# Altium PCB SOM_PCB_6Layer.PcbDoc (part 5 of 6)
Units mil, origin at the board's own origin, x right, y up, seen from the top; angles counter-clockwise.
Board outline 1230 x 2725 mil, 6 copper layers (Top Layer, GND+SHIELD, MidLayer1, MidLayer2, PWR, Bottom Layer), stack 60.8 mil thick; 76 components, 194 nets, 972 pads, 577 vias.
Unrouted connection lines stored in the file: 151.
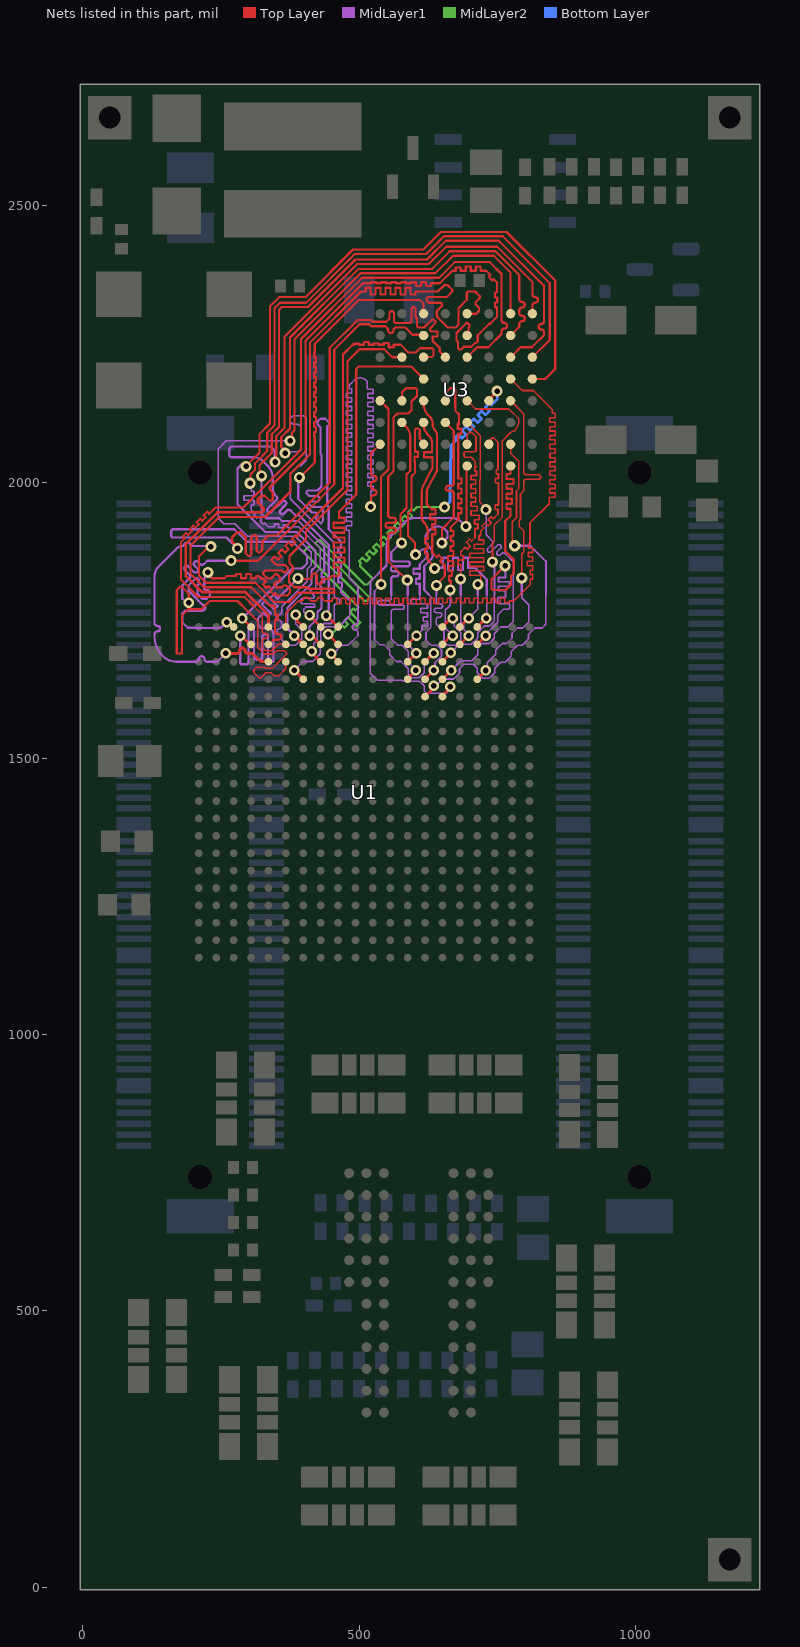
[diagram p8: the nets of this part, all layers, seen from the top]

## Via types
v1: diameter 19, hole 10, Top Layer to Bottom Layer, tented both sides, 352 vias
v2: diameter 20, hole 10, Top Layer to Bottom Layer, tented both sides, 223 vias
v3: diameter 20, hole 10, Top Layer to Bottom Layer, 1 vias
v4: diameter 30, hole 15, Top Layer to Bottom Layer, tented both sides, 1 vias

## Nets (pads, with @x,y where several pads share a name; then routed paths per layer and width w, separated by ;. In a path a pad name is that pad's centre, name@x,y a point inside that pad or via, vN(x,y) a via of type N, cw(c..) or ccw(c..) an arc to the next point about the centre after c; other vN are vias at no path point) (continued)
FLASH_A7: U1.C5 U3.C2 | length 1514.1
  Top Layer w4: v2(231.67,1883.5) 227.83,1883.5 210.55,1866.22 210.55,1830.27 222.82,1818 312,1818 346.66,1783.34 373.34,1783.34 390,1800 455,1800 455,1804 452,1807 408.09,1807 405.26,1809.83 382.54,1809.83 373.17,1819.21 373.17,1832.46 379.89,1839.19 379.89,1847.48 374,1853.37 374,1866.63 402.37,1895 402.66,1895 403.94,1896.28 403.94,1911.06 479,1986.12 479,2219 500.76,2240.76 545.82,2240.76 560.32,2226.26 U3.C2@577.52,2226.26
  Top Layer w5: v1(258.5,1690) 278.5,1690 ccw(c278.5,1695) 283.5,1695 cw(c288.5,1695) 293.5,1695 ccw(c298.5,1695) 298.5,1690 307.17,1690 321.52,1675.64 335.34,1675.64 U1.C5@336.02,1674.96
  MidLayer1 w4: v2(231.67,1883.5) 230.87,1884.3 199.3,1884.3 cw(c199.3,1889.3) 194.35,1888.58 192.01,1890.92 186.59,1890.92 184.25,1888.58 cw(c179.3,1889.3) 179.3,1884.3 ccw(c179.3,1872.23) 170.77,1880.77 137.07,1847.07 ccw(c154.14,1830) 130,1830 130,1742.93 131.46,1741.46 ccw(c135,1745) 135,1740 cw(c135,1735) 135,1730 ccw(c135,1725) 130,1725 130,1721.21 ccw(c181.21,1721.21) 130.01,1719.99 ccw(c181.21,1721.21) 145,1685 ccw(c169.14,1709.14) 151.75,1679.76 ccw(c169.14,1709.14) 169.14,1675 205,1675 ccw(c205,1680) 210,1680 cw(c215,1680) 220,1680 ccw(c225,1680) 225,1675 243.5,1675 v1(258.5,1690)
FLASH_A8: U1.D7 U3.A3 | length 1550
  Top Layer w4: v2(392.19,2008.69) 393.52,2010.03 394.17,2010.03 420,2035.86 420,2080 420,2082 419,2082 419,2091 422,2091 422,2100 419,2100 419,2109 422,2109 422,2118 419,2118 419,2127 422,2127 422,2136 419,2136 419,2145 422,2145 422,2154 419,2154 419,2163 422,2163 422,2172 419,2172 419,2181 422,2181 422,2190 419,2190 419,2199 422,2199 422,2208 419,2208 419,2217 422,2217 422,2226 419,2226 419,2235 420,2235 420,2238.81 420,2250.25 499.75,2330 610,2330 616.89,2323.11 U3.A3@616.89,2305
  Top Layer w5: v1(382.86,1659.62) U1.D7@399.02,1643.46
  MidLayer1 w3: v1(382.86,1659.62) 398.67,1675.44 416.01,1675.44 430,1689.44 430,1709.55 430.54,1710.09 430.54,1730.2 438.74,1738.4 463.2,1738.4 483,1758.2 483,1785.49 472.24,1796.24
  MidLayer1 w4: v2(392.19,2008.69) 390,2006.5 390,1970 415,1945 421.63,1945 424.34,1942.28 424.34,1939.34 422.26,1937.26 422.26,1933.95 430.61,1925.61 435,1930 435,1952.66 432.66,1955 415,1955 410,1960 410,1962.66 412.34,1965 425,1965 428.34,1968.34 428.34,1971.66 425,1975 410,1975 405,1980 405,1982.66 407.34,1985 425,1985 432.18,1992.18 432.18,2049.6 430,2051.78 430,2100 425,2105 425,2110 430,2115 438.75,2115 445.84,2107.9 445.84,2104.59 442.5,2101.25 442.5,1957.64 445,1955.14 445,1915 467.5,1892.5 467.5,1881.5 462.5,1881.5 462.5,1872.5 467.5,1872.5 467.5,1863.5 462.5,1863.5 462.5,1854.5 467.5,1854.5 467.5,1845.5 462.5,1845.5 462.5,1836.5 467.5,1836.5 467.5,1827.5 462.5,1827.5 462.5,1818.5 469.08,1818.5 469.08,1809.5 467.5,1809.5 467.5,1800.99 472.24,1796.24
FLASH_A9: U1.C6 U3.B3 | length 1568.4
  Top Layer w3: 299.39,1765.61 316.53,1748.47 316.53,1701.2 328.78,1688.96 344.64,1688.96 350.68,1695 365,1695 368.76,1691.24 368.76,1688.76 343.46,1663.46 331.26,1663.46 329.72,1665 315,1665 310,1660 310,1655 319.41,1645.59 321.89,1645.59 331.26,1654.96 340.79,1654.96 345.75,1650 355,1650 367.52,1662.52 U1.C6@367.52,1674.96
  Top Layer w4: v1(191.68,1781.9) 191.68,1782.07 191.9,1782.29 191.9,1798.1 180,1810 175,1810 170,1805 170,1690 179.79,1690 179.79,1759.08 190.71,1770 215,1770 230,1785 280,1785 299.39,1765.61 ; v2(268.51,1858) 316.94,1858 455,1996.06 455,2240 500.76,2285.76 518.48,2285.76 522.03,2282.21 547.49,2282.21 552.5,2277.2 552.5,2275.13 ccw(c557.5,2275.13) 562.5,2275.13 cw(c567.5,2275.13) 567.5,2280.13 583.53,2280.13 596.7,2266.96 615.56,2266.96 U3.B3@616.89,2265.63
  MidLayer1 w4: v1(191.68,1781.9) 188.23,1781.9 180.94,1789.18 180,1789.18 180,1812.98 193.31,1826.29 ccw(c190.13,1829.47) 193.31,1832.66 184.75,1841.22 cw(c187.93,1844.4) 184.75,1847.58 cw(c187.93,1844.4) 191.12,1847.58 201,1837.69 ccw(c204.18,1840.88) 207.37,1837.69 ccw(c204.18,1840.88) 207.37,1844.06 202.21,1849.21 cw(c205.39,1852.4) 202.21,1855.58 cw(c205.39,1852.4) 208.57,1855.58 212.4,1851.75 ccw(c215.59,1854.93) 218.77,1851.75 225.02,1858 v2(268.51,1858)
FLASH_A10: U1.A3 U3.C3 | length 1502.7
  Top Layer w4: v2(226.55,1836.9) 226.55,1832.78 233.33,1826 256.63,1826 260.63,1830 270,1830 277.25,1830 277.25,1834 286.25,1834 286.25,1826 295.25,1826 295.25,1834 304.25,1834 304.25,1826 313.25,1826 313.25,1830 315.25,1830 319,1830 321.63,1827.37 321.63,1826 323.04,1824.59 325.07,1826.61 331.44,1820.25 326.25,1815.06 332.61,1808.7 336.3,1812.39 342.66,1806.02 339.24,1802.6 345.61,1796.24 348.5,1799.13 350.99,1796.64 351.39,1796.24 352.63,1795 370,1795 375,1800 375,1806.06 368.11,1812.95 362.95,1812.95 360,1810 350,1810 346.66,1813.34 346.66,1816.66 350,1820 354.66,1820 357,1822.34 357,1828 351.66,1833.34 348.34,1833.34 340.66,1825.66 334.34,1825.66 326.66,1833.34 326.66,1836.66 330,1840 360,1840 363.04,1836.96 366.35,1836.96 370.87,1841.48 370.87,1845.19 366.06,1850 356.78,1850 cw(c356.78,1865.98) 345.48,1854.68 340.86,1859.3 347.23,1865.66 353.22,1859.67 359.58,1866.04 353.59,1872.02 359.96,1878.39 365.94,1872.4 372.31,1878.77 366.32,1884.75 372.68,1891.12 378.67,1885.13 385.04,1891.49 379.05,1897.48 385.41,1903.84 387.86,1901.39 392.17,1905.7 392.17,1910.6 471,1989.43 471,2231 488.76,2248.76 490.76,2248.76 490.76,2250.76 499.76,2250.76 499.76,2248.76 508.76,2248.76 508.76,2253.76 517.76,2253.76 517.76,2248.76 526.76,2248.76 526.76,2251.13 535.76,2251.13 535.76,2248.76 544.76,2248.76 544.76,2251.73 553.76,2251.73 553.76,2244.14 562.76,2244.14 562.76,2248.76 570.74,2248.76 575.53,2248.76 589.33,2234.96 602.58,2234.96 610.11,2242.48 632.66,2242.48 635,2240.14 635,2230 631.39,2226.39 617.02,2226.39 U3.C3@616.89,2226.26
  Top Layer w5: v1(260.32,1746.74) 261.81,1746.74 270.6,1737.95 U1.A3@273.03,1737.95
  MidLayer1 w4: v2(226.55,1836.9) 226.55,1833.1 220,1826.56 220,1806.69 222.34,1804.34 227.66,1804.34 230,1802 230,1800 230.05,1799.95 230.05,1794.95 224.26,1789.16 215.84,1789.16 207.43,1797.57 207.43,1813.79 210,1816.36 210,1823.67 207.66,1826.01 204.34,1826.01 191.12,1812.79 191.12,1803.78 192.24,1802.66 216.75,1778.15 cw(c216.75,1773.15) 216.75,1768.15 215.99,1767.4 184.94,1767.4 179.92,1762.37 179.92,1746.79 190,1736.7 206.6,1736.7 207.34,1735.96 249.18,1735.96 259.96,1746.74 v1(260.32,1746.74)
FLASH_A11: U1.B4 U3.D3 | length 1467.7
  Top Layer w4: v2(389.17,1825.83) 390,1825 410,1825 ccw(c410,1829.5) 414.5,1829.5 414.5,1830.5 cw(c419,1830.5) 423.5,1830.5 423.5,1819.5 ccw(c428,1819.5) 432.5,1819.5 432.5,1820.5 cw(c437,1820.5) 437,1825 445,1825 448.09,1828.09 450,1830 461.34,1830 463.69,1832.34 463.69,1843.69 463.69,1845.69 453.69,1845.69 453.69,1854.69 473.69,1854.69 473.69,1863.69 453.69,1863.69 453.69,1872.69 473.69,1872.69 473.69,1881.69 453.69,1881.69 453.69,1890.69 473.69,1890.69 473.69,1899.69 453.69,1899.69 453.69,1908.69 473.69,1908.69 473.69,1917.69 453.69,1917.69 453.69,1926.69 473.69,1926.69 473.69,1935.69 463.69,1935.69 463.69,1946.31 495,1977.63 495,2205 499.39,2209.39 594.39,2209.39 U3.D3@616.89,2186.89
  Top Layer w5: v1(284.86,1722.2) 284.86,1724.04 302.45,1706.46 U1.B4@304.53,1706.46
  MidLayer1 w4: v1(284.86,1722.2) 284.86,1673 ccw(c287.2,1673) 287.2,1670.66 297.66,1670.66 ccw(c297.66,1673) 300,1673 300,1737 cw(c302.34,1737) 302.34,1739.34 310,1739.34 310,1684.08 ccw(c315.36,1684.08) 315.36,1678.72 320.72,1678.72 ccw(c320.72,1683) 325,1683 325,1720 cw(c329.34,1720) 329.34,1724.34 332.66,1724.34 cw(c332.66,1722) 335,1722 335,1677.34 ccw(c337.34,1677.34) 337.34,1675 345,1675 345,1725.63 ccw(c335.63,1725.63) 335.63,1735 326.26,1735 cw(c326.26,1744.31) 316.95,1744.31 316.95,1753.62 319.17,1755.83 ; 320.58,1757.25 319.17,1755.83 ; v2(389.17,1825.83) 356.67,1793.33 352.4,1789.07 345.23,1796.24 338.86,1789.88 353.11,1775.63 346.74,1769.27 330.5,1785.52 324.13,1779.15 340.38,1762.9 334.02,1756.54 326.95,1763.61 319.17,1755.83
FLASH_A12: U1.A4 U3.C4 | length 1619.8
  Top Layer w4: v2(280,1880) 280,1882.63 270,1892.63 270,1900 280,1910 285,1910 295,1900 295,1871 299.34,1866.66 302.66,1866.66 305,1869 305,1900 309.13,1904.13 312.66,1904.13 315,1901.78 315,1875.37 317.34,1873.03 320.66,1873.03 325,1877.37 325,1892.66 336.02,1903.69 351.31,1903.69 447,1999.37 447,2243.31 497.45,2293.76 521.79,2293.76 525.05,2290.5 549.4,2290.5 555,2296.1 555,2307 557.34,2309.34 560.66,2309.34 563.02,2306.98 563.02,2290.47 565.36,2288.13 592.66,2288.13 595,2290.47 595,2315 596.73,2316.73 600.05,2316.73 602.39,2314.39 602.39,2298.99 605,2296.38 605,2282.47 607.34,2280.13 617.66,2280.13 631.8,2294.28 635.17,2294.28 638.17,2291.27 638.17,2287.96 628.48,2278.27 628.48,2274.96 630.82,2272.62 638.33,2272.62 641.76,2272.62 641.76,2263.62 633.33,2263.62 633.33,2254.62 cw(c633.33,2252.59) 634.77,2254.02 646.05,2242.74 646.05,2236.56 656.26,2226.35 U3.C4@656.26,2226.26
  Top Layer w5: v1(288.42,1753.34) 288.78,1753.34 304.17,1737.95 U1.A4@304.53,1737.95
  MidLayer1 w4: v2(280,1880) 260,1900 162.34,1900 160,1902.34 160,1912.66 162.34,1915 274.39,1915 296.97,1892.42 380.21,1892.42 406,1866.63 406,1853.37 396.63,1844 379.08,1844 v1(288.42,1753.34)
FLASH_A13: U1.B5 U3.A5 | length 1571.6
  Top Layer w4: U1.B5@336.02,1706.46 337.32,1706.46 345.86,1715 355,1715 359.34,1719.34 359.34,1722.66 357,1725 351.48,1725 348.02,1728.46 348.02,1740 348.02,1751 353.02,1751 353.02,1760 348.02,1760 348.02,1765 348.02,1773.99 345.68,1776.34 338.66,1776.34 331.59,1783.41 328.3,1786.7 325,1790 305,1810 219.51,1810 195,1834.51 195,1885 247,1937 329.63,1937 376,1983.37 376,2015.13 411,2050.13 411,2252.57 503.43,2345 510,2345 512,2345 512,2352 521,2352 521,2340 530,2340 530,2352 539,2352 539,2340 548,2340 548,2352 557,2352 557,2340 566,2340 566,2352 575,2352 575,2340 584,2340 584,2352 593,2352 593,2340 602,2340 602,2345 612.3,2345 642.63,2345 654.66,2357.03 660.12,2357.03 668.57,2348.57 668.57,2345 658.57,2335 624.31,2335 621.97,2332.66 621.97,2329.34 ; 622.55,2328.77 626.31,2325 647.75,2325 650.1,2322.66 650.1,2319.34 640.82,2310.07 640.82,2299.93 660.75,2280 675,2280 680,2285 680,2315 695,2330 695,2342.66 697.34,2345 710,2345 718.34,2336.66 718.34,2333.34 710.66,2325.66 710.66,2322.34 716.25,2316.75 cw(c714.44,2314.94) 717,2314.94 717,2311.88 cw(c712.46,2311.88) 715.67,2308.67 712,2305 U3.A5@695.63,2305
FLASH_A14: U1.A5 U3.B5 | length 1565.2
  Top Layer w4: 322.99,1974.91 322.99,1975.61 329.39,1975.61 338.34,1966.66 341.66,1966.66 344,1969 344,1981 337.84,1987.16 337.84,1990.47 353.37,2006 353.45,2006 403,2055.55 403,2255.88 507.12,2360 520.12,2360 522.12,2360 522.12,2362 531.12,2362 531.12,2360 540.12,2360 540.12,2362 549.12,2362 549.12,2360 558.12,2360 558.12,2362 567.12,2362 567.12,2360 576.12,2360 576.12,2362 585.12,2362 585.12,2360 594.12,2360 594.12,2362 603.12,2362 603.12,2355 612.12,2355 612.12,2362 621.12,2362 621.12,2355 630.12,2355 630.12,2360 640,2360 646.31,2360 669.12,2382.81 673.09,2382.81 675.09,2382.81 675.09,2388.77 684.09,2388.77 684.09,2382.81 693.09,2382.81 693.09,2390.34 702.09,2390.34 702.09,2382.81 711.09,2382.81 711.09,2390.34 720.09,2390.34 720.09,2382.81 730.04,2382.81 730.34,2382.52 738.12,2374.74 734.99,2371.62 741.36,2365.25 743.64,2367.53 750,2361.17 749.5,2360.67 749.5,2354.5 749.5,2343.5 746,2343.5 746,2334.5 750,2334.5 750,2325.5 746,2325.5 746,2316.5 749.5,2316.5 749.5,2311.2 749.5,2298.99 737.43,2286.92 735.78,2286.92 715,2266.14 715,2255 712.19,2252.19 710.24,2252.19 703.06,2245 690,2245 685.1,2240.1 681.79,2240.1 679.1,2242.79 679.1,2254.1 676.42,2256.79 676.42,2270.1 694,2287.69 697.31,2287.69 700,2285 700,2281.52 698.12,2279.64 698.12,2268.12 U3.B5@695.63,2265.63
  Top Layer w5: 323.3,1975.22 322.99,1974.91 317.07,1968.99 317.07,1962.93 327.43,1952.57 327.43,1948.43 324.5,1945.5 243.48,1945.5 186.5,1888.52 186.5,1830 213.54,1802.96 214.52,1802.96 215.99,1801.5 294.11,1801.5 336.02,1759.58 U1.A5@336.02,1737.95
FLASH_A15: U1.B6 U3.C5 | length 1517.9
  Top Layer w3: 310,1775 324.52,1760.48 324.52,1731.69 ccw(c329.52,1731.69) 329.52,1726.69 cw(c329.52,1721.69) 329.52,1716.69 ccw(c329.52,1711.69) 324.52,1711.69 324.52,1701.69 331.26,1694.96 342.15,1694.96 353.65,1706.46 U1.B6@367.52,1706.46
  Top Layer w4: 310,1775 293,1792 209.31,1792 205.07,1796.24 178,1823.31 178,1892.04 182.98,1897.02 184.39,1898.44 180.86,1901.97 187.22,1908.33 190.76,1904.8 197.12,1911.16 193.59,1914.7 199.95,1921.06 203.49,1917.53 209.85,1923.89 206.31,1927.43 212.68,1933.79 216.21,1930.26 222.58,1936.62 219.04,1940.15 225.41,1946.52 228.94,1942.98 235.31,1949.35 239.96,1954 290.06,1954 350.06,2014 350.14,2014 395,2058.86 395,2259.2 505.8,2370 645,2370 673.34,2398.34 736.66,2398.34 758,2377 758,2293.12 ccw(c763,2293.12) 763,2288.12 cw(c763,2283.12) 763,2278.12 ccw(c763,2273.12) 758,2273.12 758,2268.12 734.06,2244.19 713.56,2244.19 U3.C5@695.63,2226.26
FLASH_A16: U1.A6 U3.D7 | length 1555.5
  Top Layer w3: U1.A6@367.52,1737.95 367.52,1762.79 389.73,1785 394.73,1785 ccw(c394.73,1790) 399.73,1790 401.2,1791.46 408.27,1791.46 409.73,1790 ccw(c414.73,1790) 414.73,1785 419.73,1785 ccw(c419.73,1790) 424.73,1790 426.2,1791.46 433.27,1791.46 434.73,1790 ccw(c439.73,1790) 439.73,1785 450.18,1785 451.68,1785 451.68,1790 459.68,1790 459.68,1780 467.68,1780 467.68,1790 475.68,1790 475.68,1780 483.68,1780 483.68,1790 491.68,1790 491.68,1780 499.68,1780 499.68,1790 507.68,1790 507.68,1780 515.68,1780 515.68,1790 523.68,1790 523.68,1780 531.68,1780 531.68,1790 539.68,1790 539.68,1780 547.68,1780 547.68,1790 555.68,1790 555.68,1780 563.68,1780 563.68,1790 571.68,1790 571.68,1780 579.68,1780 579.68,1790 587.68,1790 587.68,1780 595.68,1780 595.68,1790 603.68,1790 603.68,1780 611.68,1780 611.68,1790 619.68,1790 619.68,1780 627.68,1780 627.68,1790 635.68,1790 635.68,1780 643.68,1780 643.68,1790 651.68,1790 651.68,1782 659.68,1782 659.68,1790 667.68,1790 667.68,1782 675.68,1782 675.68,1790 683.68,1790 683.68,1782 691.68,1782 691.68,1790 699.68,1790 699.68,1782 707.68,1782 707.68,1790 715.68,1790 715.68,1782 723.68,1782 723.68,1790 731.68,1790 731.68,1782 739.68,1782 739.68,1790 747.68,1790 747.68,1782 755.68,1782 755.68,1790 763.68,1790 763.68,1782 771.68,1782 771.68,1785 780,1785 810,1815 810,1815.38 810,1824.88 814.5,1824.88 814.5,1832.88 810,1832.88 810,1840.88 814.5,1840.88 814.5,1848.88 804.5,1848.88 804.5,1856.88 814.5,1856.88 814.5,1864.88 806.3,1864.88 806.3,1872.88 814.5,1872.88 814.5,1880.88 806.33,1880.88 806.33,1888.88 809.5,1888.88 809.5,1895.81 809.5,1926.57 844.15,1961.22 844.15,1971.73 845,1972.58 855,1972.58 855,1980.58 845,1980.58 845,1988.58 855,1988.58 855,1996.58 845,1996.58 845,2004.58 855,2004.58 855,2012.58 845,2012.58 845,2020.58 855,2020.58 855,2028.58 845,2028.58 845,2036.58 855,2036.58 855,2044.58 845.5,2044.58 845.5,2052.58 855,2052.58 855,2060.58 845,2060.58 845,2068.58 855,2068.58 855,2076.58 845,2076.58 845,2084.58 855,2084.58 855,2092.58 845,2092.58 845,2100.58 855,2100.58 855,2108.58 845,2108.58 845,2116.58 855,2116.58 855,2124.58 850,2124.58 850,2129.56 850,2131.06 815.17,2165.89 795.37,2165.89 U3.D7@774.37,2186.89
FLASH_A17: U1.B7 U3.D8 | length 1589.1
  Top Layer w4: v2(295.44,2028.62) 296.42,2029.88 296.88,2030.56 320.09,2053.77 320.09,2087.46 339,2106.37 339,2318.31 355.69,2335 402.92,2335 489.08,2421.16 616.16,2421.16 648,2453 767,2453 855,2365 855,2205 836.89,2186.89 U3.D8@813.74,2186.89
  Top Layer w5: v1(382.54,1722.2) 383.27,1722.2 U1.B7@399.02,1706.46
  MidLayer1 w4: v2(295.44,2028.62) 291.57,2031.59 290.1,2031.59 288.34,2033.34 280,2025 280,1960 330,1910 387.37,1910 421,1876.37 421,1847.16 414,1840.16 414,1816.43 393.81,1796.24 370.39,1772.83 370.39,1735.08 382.54,1722.94 v1(382.54,1722.2)
FLASH_A18: U1.A7 U3.A7 | length 1505.9
  Top Layer w4: v2(375.34,2074.78) 378.4,2077.84 378.4,2089.21 383,2093.8 383,2258.51 502.65,2378.16 638.16,2378.16 670,2410 743.69,2410 774.37,2379.32 U3.A7@774.37,2305
  Top Layer w5: v1(385.39,1760) 388.07,1757.32 388.07,1748.9 U1.A7@399.02,1737.95
  MidLayer1 w3: v2(375.34,2074.78) 259.78,2074.78 245,2060 245,1935 255,1925 275,1925 298,1902 384.77,1902 413.5,1873.27 413.5,1850.27 406,1842.77 406,1820.75 381.49,1796.24 360,1774.75 360,1765 cw(c355,1765) 355,1760 ccw(c355,1755) 355,1750 cw(c355,1745) 360,1745 360,1740 cw(c355,1740) 355,1735 ccw(c355,1732) 352,1732 352,1728 ccw(c355,1728) 355,1725 cw(c355,1720) 360,1720 360,1715 370,1705 385.13,1705 396.54,1716.41 396.54,1732.26 385.39,1743.41 v1(385.39,1760)
FLASH_A19: U1.C8 U3.B7 | length 1519.6
  Top Layer w4: v2(366.13,2052.62) 366.13,2056.95 359.34,2063.73 359.34,2081.46 375,2097.12 375,2261.82 499.33,2386.16 632.47,2386.16 664.31,2418 747,2418 790,2375 790,2331.26 ccw(c795,2331.26) 795,2326.26 cw(c795,2321.26) 795,2316.26 ccw(c795,2311.26) 790,2311.26 790,2306.26 ccw(c795,2306.26) 795,2301.26 cw(c795,2296.26) 795,2291.26 ccw(c795,2286.26) 790,2286.26 790,2281.26 U3.B7@774.37,2265.63
  Top Layer w5: v1(414.76,1694) 414.76,1690.71 U1.C8@430.51,1674.96
  MidLayer1 w3: v2(366.13,2052.62) 368.51,2055 390,2055 395,2060 395,2100 390,2105 380,2105 375,2110 375,2115 380,2120 400,2120 404.18,2115.82 404.18,2039.18 395,2030 390,2030 375.5,2015.5 375.5,1970.11 455,1890.61 455,1795 ccw(c460,1795) 460,1790 cw(c460,1785) 460,1780 ccw(c460,1775) 455,1775 455,1750 449.4,1744.4 436.25,1744.4 424.54,1732.69 424.54,1714.1 417.83,1707.39 417.83,1697.06 v1(414.76,1694)
FLASH_A20: U1.B8 U3.C7 | length 1478.5
  Top Layer w4: v2(323.66,2011.6) 323.58,2011.6 320.07,2015.11 320.07,2031.13 342,2053.06 342,2086.75 355,2099.75 355,2311.69 360.31,2317 407.55,2317 493.55,2403 623,2403 657,2437 753,2437 835,2355 835,2291.38 cw(c830,2291.38) 830,2286.38 ccw(c830,2281.38) 830,2276.38 cw(c830,2271.38) 835,2271.38 835,2266.38 812.8,2244.19 792.3,2244.19 U3.C7@774.37,2226.26
  Top Layer w5: v1(410.54,1722.2) 414.76,1722.2 U1.B8@430.51,1706.46
  MidLayer1 w4: v2(323.66,2011.6) 323.66,1942.66 331.6,1934.71 355.29,1934.71 360,1930 390,1930 437,1883 437,1840.53 432,1835.53 432,1828 437,1828 437,1819 430,1819 430,1810 432,1810 432,1808 432,1798.45 432,1772.1 425,1765.1 425,1753.79 410.54,1739.32 v1(410.54,1722.2)
FLASH_A21: U1.A8 U3.C8 | length 1589.3
  Top Layer w4: v2(302.9,1998.16) 303.6,1998.86 303.6,2014.16 311.91,2022.46 311.91,2034.28 334,2056.37 334,2090.06 347,2103.06 347,2315 357,2325 404.24,2325 492.39,2413.16 621.84,2413.16 653.69,2445 760,2445 845,2360 845,2257.52 U3.C8@813.74,2226.26
  Top Layer w5: v1(410.35,1759.65) 410.35,1758.88 430.51,1738.72 U1.A8@430.51,1737.95
  MidLayer1 w3: v2(302.9,1998.16) 305,1996.06 305,1985 305,1983.5 310,1983.5 310,1975.5 291.64,1975.5 291.64,1967.5 310,1967.5 310,1959.5 305,1959.5 305,1953.56 305,1950 306.06,1948.94 311.97,1943.03 309.77,1940.83 315.43,1935.18 317.98,1937.73 323.64,1932.07 321.09,1929.52 326.74,1923.86 328.94,1926.06 330,1925 335.3,1919.7 340.15,1919.7 346.98,1919.7 346.98,1924.42 354.98,1924.42 354.98,1917.5 362.98,1917.5 362.98,1922.5 370.98,1922.5 370.98,1917.5 378.98,1917.5 378.98,1919.7 380.48,1919.7 389.7,1919.7 429.5,1879.89 429.5,1843.64 421.5,1835.64 421.5,1806.5 421.34,1806.34 414.51,1806.34 411.96,1803.79 411.96,1801.3 419.01,1794.24 419.01,1791.76 417.26,1790 396.76,1790 395,1788.24 395,1781.76 396.76,1780 418.24,1780 420,1778.24 420,1774.12 404.12,1774.12 400,1770 400,1765 400.67,1765 405.32,1760.35 v1@410.35,1760.35
FLASH_A22: U1.A9 U3.A8 | length 1481.6
  Top Layer w4: v2(348.24,2036.57) 350,2038.33 350,2083.43 365,2098.43 365,2263.14 496.86,2395 626.31,2395 657.66,2426.34 749.97,2426.34 813.74,2362.57 813.74,2340 ccw(c818.74,2340) 818.74,2335 cw(c818.74,2330) 818.74,2325 ccw(c818.74,2320) 813.74,2320 U3.A8@813.74,2305
  Top Layer w5: v1(441,1758.74) 441.24,1758.74 U1.A9@462.01,1737.95
  MidLayer1 w4: 287.34,2065 287.04,2064.7 ; v2(348.24,2036.57) 347.43,2037.38 347.43,2052.57 ccw(c335.3,2052.57) 335.3,2064.7 287.04,2064.7 ; v1(441,1758.74) 443.87,1761.61 443.87,1767.45 445,1768.58 445,1886.31 391.31,1940 385,1940 377.5,1947.5 376.09,1948.91 ccw(c372.91,1945.73) 369.72,1948.91 364.24,1943.43 cw(c361.06,1946.62) 357.88,1943.43 cw(c361.06,1946.62) 357.88,1949.8 366.89,1958.81 ccw(c363.71,1961.99) 366.89,1965.18 ccw(c363.71,1961.99) 360.53,1965.18 341.25,1945.89 cw(c338.07,1949.08) 334.88,1945.89 cw(c338.07,1949.08) 334.88,1952.26 350.63,1968.01 ccw(c347.45,1971.19) 350.63,1974.37 348.48,1976.52 cw(c359.28,1987.33) 344,1987.33 344,2007.52 ccw(c313.27,2007.52) 335,2029.25 325.78,2038.47 ccw(c310,2022.68) 310,2045 270,2045 cw(c270,2050) 265,2050 265,2058.79 cw(c270.91,2058.79) 266.31,2062.5 cw(c270.91,2058.79) 270.91,2064.7 287.04,2064.7
FLASH_A23: U1.C9 U3.G1 | length 1516
  Top Layer w4: v2(521,1956) 521.57,1956.57 521.57,1971.57 cw(c526.57,1971.57) 526.57,1976.57 ccw(c526.57,1981.57) 526.57,1986.57 cw(c526.57,1991.57) 521.57,1991.57 521.57,1996.57 cw(c526.57,1996.57) 526.57,2001.57 ccw(c526.57,2006.57) 526.57,2011.57 cw(c526.57,2016.57) 521.57,2016.57 521.57,2052.2 U3.G1@538.15,2068.78
  Top Layer w5: v1(450,1689.63) 450,1688.3 462.01,1676.29 U1.C9@462.01,1674.96
  MidLayer1 w3: v1(450,1689.63) 453.11,1689.63 468.19,1704.71 480.06,1704.71 498,1722.65 498,1727.65 ccw(c493,1727.65) 493,1732.65 cw(c493,1737.65) 493,1742.65 ccw(c493,1747.65) 498,1747.65 498,1810 482,1826 482,1911.57 482,1913.07 477,1913.07 477,1921.07 487,1921.07 487,1929.07 477,1929.07 477,1937.07 487,1937.07 487,1945.07 477,1945.07 477,1953.07 487,1953.07 487,1961.07 477,1961.07 477,1969.07 487,1969.07 487,1977.07 477,1977.07 477,1985.07 487,1985.07 487,1993.07 477,1993.07 477,2001.07 487,2001.07 487,2009.07 477,2009.07 477,2017.07 487,2017.07 487,2025.07 477,2025.07 477,2033.07 487,2033.07 487,2041.07 477,2041.07 477,2049.07 487,2049.07 487,2057.07 477,2057.07 477,2065.07 487,2065.07 487,2073.07 477,2073.07 477,2081.07 487,2081.07 487,2089.07 477,2089.07 477,2097.07 487,2097.07 487,2105.07 477,2105.07 477,2113.07 487,2113.07 487,2121.07 477,2121.07 477,2129.07 487,2129.07 487,2137.07 477,2137.07 477,2145.07 487,2145.07 487,2153.07 477,2153.07 477,2161.07 487,2161.07 487,2169.07 482,2169.07 482,2175.38 491.62,2185 cw(c501.28,2175.34) 501.28,2189 cw(c501.28,2172.44) 512.98,2184.16 513.14,2184 cw(c508.63,2179.5) 515,2179.5 515,2170 516.5,2168.5 526,2168.5 526,2160.5 516,2160.5 516,2152.5 526,2152.5 526,2144.5 516,2144.5 516,2136.5 526,2136.5 526,2128.5 516,2128.5 516,2120.5 526,2120.5 526,2112.5 516,2112.5 516,2104.5 526,2104.5 526,2096.5 516,2096.5 516,2088.5 526,2088.5 526,2080.5 516,2080.5 516,2072.5 526,2072.5 526,2064.5 516,2064.5 516,2056.5 526,2056.5 526,2048.5 516,2048.5 516,2040.5 526,2040.5 526,2032.5 516,2032.5 516,2024.5 526,2024.5 526,2016.5 516,2016.5 516,2008.5 526,2008.5 526,2000.5 516,2000.5 516,1992.5 526,1992.5 526,1984.5 521,1984.5 521,1975 v2(521,1956)
FLASH_A24: U1.D8
FLASH_CLK: U1.B9 U3.E6 | length 1516
  Top Layer w5: v1(444.54,1724.4) 446.26,1722.68 446.26,1722.2 U1.B9@462.01,1706.46 ; U3.E6@735,2147.52 735,2150 v2(750,2165)
  MidLayer2 w4: v1(444.54,1724.4) 448.59,1724.4 453.01,1728.82 454.04,1728.82 460,1734.79 461.41,1736.2 457.88,1739.74 464.24,1746.1 473.64,1736.7 480,1743.07 473.79,1749.28 480.15,1755.65 496.07,1739.73 502.44,1746.09 483.5,1765.03 489.86,1771.39 493.23,1768.02 497.61,1772.39 499.13,1773.92 423.05,1850 423,1850 400.66,1872.34 400.66,1875.66 408.34,1883.34 411.66,1883.34 510,1785 513.69,1785 519.34,1790.66 420.66,1889.34 426.31,1895 430,1895 510,1815 515,1815 523.34,1823.34 523.34,1826.66 501.66,1848.34 501.66,1851.66 502.07,1852.07 503.49,1853.49 499.95,1857.02 506.31,1863.39 513.39,1856.31 519.75,1862.68 512.68,1869.75 519.04,1876.11 526.11,1869.04 532.48,1875.41 525.41,1882.48 531.77,1888.84 538.84,1881.77 545.21,1888.13 538.13,1895.2 544.5,1901.57 551.57,1894.5 557.93,1900.86 550.86,1907.93 557.23,1914.3 564.3,1907.23 570.66,1913.59 563.59,1920.66 569.95,1927.02 577.02,1919.95 583.39,1926.32 576.32,1933.39 582.68,1939.75 589.75,1932.68 596.12,1939.05 589.05,1946.12 595.41,1952.48 598.95,1948.95 605,1955 v2(655,1955)
  Bottom Layer w5: v2(655,1955) 663.32,1963.02 664.81,1964.46 666.68,2066.68 674.27,2074.27 676.04,2076.04 672.5,2079.57 679.57,2086.64 686.64,2079.57 693.71,2086.64 686.64,2093.71 693.71,2100.78 700.78,2093.71 707.86,2100.78 700.78,2107.86 707.86,2114.93 714.93,2107.86 722,2114.93 714.93,2122 722,2129.07 729.07,2122 736.14,2129.07 729.07,2136.14 736.14,2143.21 739.68,2139.68 745,2145 750,2150 v2(750,2165)
FLASH_D0: U1.D13 U3.F2 | length 682.2
  Top Layer w4: v2(577,1890.14) 575,1892.14 575,1942.17 586,1953.17 586,2014.08 592.52,2020.6 592.52,2082.54 ccw(c566.91,2082.54) 585.02,2100.65 U3.F2@577.52,2108.15
  Top Layer w5: U1.D13@587.99,1643.46 587.99,1644.26 602.95,1659.21 v1(602.95,1660.01)
  MidLayer1 w3: 558.24,1796.24 558.24,1789.82 cw(c554.24,1789.82) 554.24,1785.82 538,1785.82 ccw(c538,1781.82) 538,1777.82 578,1777.82 cw(c578,1773.82) 578,1769.82 562.24,1769.82 ccw(c562.24,1765.82) 558.24,1765.82 558.24,1756.32 558.24,1716.41 564.82,1709.82 565.18,1709.82 570.29,1704.71 578.04,1704.71 589.36,1693.39 589.36,1673.59 v1(602.95,1660.01)
  MidLayer1 w4: 558.24,1796.24 558.24,1825.24 cw(c562.74,1825.24) 562.74,1829.74 567.11,1829.74 ccw(c567.11,1834.24) 567.11,1838.74 562.1,1838.74 cw(c562.1,1843.24) 562.1,1847.74 587.63,1847.74 ccw(c587.63,1852.24) 587.63,1856.74 562.74,1856.74 cw(c562.74,1861.24) 558.24,1861.24 558.24,1873.24 574.83,1889.83 576.69,1889.83 v2(577,1890.14)
FLASH_D1: U1.C13 U3.E2 | length 650.5
  Top Layer w4: U3.E2@577.52,2147.52 577.52,2162.52 585,2170 602.66,2170 605,2167.66 605,2156.14 595,2146.14 595,2130 589.24,2124.24 569.43,2124.24 562.15,2116.95 562.15,2019.47 553,2010.32 553,1940 ccw(c557.5,1940) 557.5,1935.5 562.5,1935.5 cw(c562.5,1931) 562.5,1926.5 552.5,1926.5 ccw(c552.5,1922) 552.5,1917.5 562.5,1917.5 cw(c562.5,1913) 562.5,1908.5 557.5,1908.5 ccw(c557.5,1904) 553,1904 553,1857 v2(587.25,1822.75)
  Top Layer w5: U1.C13@587.99,1674.96 v1(603.74,1690.71)
  MidLayer1 w3: 588,1796.24 588,1706.45 v1(603.74,1690.71)
  MidLayer1 w4: v2(587.25,1822.75) 588,1822 588,1796.24
FLASH_D2: U1.B13 U3.G3 | length 632.2
  Top Layer w4: v2(602.52,1868.98) 601.5,1870 601.5,1890.17 588.5,1903.17 588.5,1942.94 595,1949.44 595,2010.35 601.52,2016.87 601.52,2035.14 601.52,2037.14 600.52,2037.14 600.52,2046.14 606.52,2046.14 606.52,2055.14 601.52,2055.14 601.52,2065.41 601.52,2095.01 603.86,2097.36 607.18,2097.36 610,2094.53 610,2079.19 616.89,2072.3 U3.G3@616.89,2068.78
  Top Layer w5: U1.B13@587.99,1706.46 603.74,1722.2 v1(604,1722.2)
  MidLayer1 w3: v1(604,1722.2) 609.33,1727.54 613.83,1732.04 613.97,1732.04 613.97,1740.04 624,1740.04 624,1748.04 616,1748.04 616,1756.04 624,1756.04 624,1764.04 611.46,1764.04 611.46,1772.04 624,1772.04 624,1780.04 594,1780.04 594,1788.04 610,1788.04 610,1795.65 610,1796.24
  MidLayer1 w4: v2(602.52,1868.98) 603.53,1870 605.83,1870 614.24,1878.41 618.59,1878.41 622.69,1874.31 622.69,1864 610,1851.31 610,1843.24 598.39,1843.24 598.39,1834.24 610,1834.24 610,1825.24 603.25,1825.24 603.25,1816.24 610,1816.24 610,1796.24
FLASH_D3: U1.B15 U3.E4 | length 656.7
  Top Layer w4: U3.E4@656.26,2147.52 657.02,2148.28 657.02,2162.02 665,2170 671.79,2170 674.13,2167.66 674.13,2135.26 674.39,2135 674.39,2129.39 681.13,2122.65 681.13,2105.78 678.5,2105.78 678.5,2096.78 685.5,2096.78 685.5,2087.78 679.5,2087.78 679.5,2078.78 679.5,2015.78 679.5,2006.78 685.5,2006.78 685.5,1997.78 679.5,1997.78 679.5,1988.78 685.5,1988.78 685.5,1979.78 679.5,1979.78 679.5,1970.78 685.5,1970.78 685.5,1961.78 679.5,1961.78 679.5,1952.78 685.5,1952.78 685.5,1943.78 679.5,1943.78 679.5,1934.78 680.5,1934.78 680.5,1932.77 666,1918.27 666,1913.52 666,1911.52 671,1911.52 671,1902.52 666,1902.52 666,1893.52 671,1893.52 671,1884.52 666,1884.52 666,1875.52 671,1875.52 671,1866.52 661,1866.52 661,1857.52 671,1857.52 671,1848.52 663,1848.52 663,1839.52 668,1839.52 668,1830.52 663,1830.52 663,1821.52 666,1821.52 666,1806 v2(665,1805)
  Top Layer w5: U1.B15@650.98,1706.46 666.73,1722.2 v1(670,1722.2)
  MidLayer1 w3: v2@665,1796.24 665,1777.13 656,1768.13 656,1736.2 v1(670,1722.2)
  MidLayer1 w4: v2@665,1796.24 v2(665,1805)
FLASH_D4: U1.A15 U3.E5 | length 655
  Top Layer w3: U3.E5@695.63,2147.52 710.63,2132.52 771.21,2132.52 789.37,2114.36 789.37,2112.3 cw(c761.49,2112.3) 788.07,2103.9 cw(c761.49,2112.3) 781.2,2092.58 ccw(c781.2,2082.34) 773.96,2089.58 759.5,2075.12 759.5,1937 745,1922.5 745,1893.32 741.44,1889.76 v2(741.44,1855.98)
  Top Layer w5: U1.A15@650.98,1737.95 666.73,1753.7 v1(670,1753.7)
  MidLayer1 w3: v1(670,1753.7) 672.3,1751.4 672.3,1739.7 684,1728 684,1711 688.34,1706.66 703.19,1706.66 714.7,1718.17 714.7,1727.69 726.71,1739.7 735.8,1739.7 745,1748.9 745,1796.24
  MidLayer1 w4: v2(741.44,1855.98) 744.5,1852.92 744.5,1846.14 745,1845.64 745,1796.24
FLASH_D5: U1.B16 U3.G5 | length 640.7
  Top Layer w3: v2(684,1825.14) 684,1849.57 684,1851.07 679,1851.07 679,1859.07 689,1859.07 689,1867.07 684,1867.07 684,1874 685.54,1875.54 692.26,1882.26 695.79,1878.72 701.45,1884.38 694.38,1891.45 700.04,1897.11 703.57,1893.57 710,1900 710,1914.11 710,1916.28 715.38,1916.28 715.38,1924.28 709,1924.28 709,1932.28 717.8,1932.28 717.8,1940.28 702.57,1940.28 702.57,1948.28 713.97,1948.28 713.97,1956.28 702.57,1956.28 702.57,1964.28 711.5,1964.28 711.5,1972.28 702.57,1972.28 702.57,1980.28 711.5,1980.28 711.5,1988.28 702.57,1988.28 702.57,1996.28 711.5,1996.28 711.5,2004.28 702.57,2004.28 702.57,2012.28 712.63,2012.28 712.63,2020.28 709.63,2020.28 709.63,2028.28 712.63,2028.28 710.63,2030.28 710.63,2037.28 702.91,2045 691.76,2045 690,2046.76 690,2053.24 691.76,2055 710,2055 711.63,2056.63 711.63,2082.25 703.88,2090 700,2090 695.63,2085.63 U3.G5@695.63,2068.78
  Top Layer w5: U1.B16@682.48,1706.46 v1(698.21,1722.24)
  MidLayer1 w3: 684,1796.24 684,1747.42 689.58,1741.84 689.58,1733.36 698.21,1724.73 v1(698.21,1722.24)
  MidLayer1 w4: 684,1796.24 v2(684,1825.14)
FLASH_D6: U1.A16 U3.G6 | length 637.8
  Top Layer w3: v2(715,1815) 720.5,1820.5 720.5,1830 720.5,1831.5 700.43,1831.5 700.43,1839.5 725.5,1839.5 725.5,1847.5 700.43,1847.5 700.43,1855.5 725.5,1855.5 725.5,1863.5 700.43,1863.5 700.43,1871.5 725.5,1871.5 725.5,1879.5 708.45,1879.5 708.45,1887.5 725.5,1887.5 725.5,1895.5 717,1895.5 717,1903.5 720.5,1903.5 720.5,1907.9 720.5,1911.5 725.06,1916.06 726.12,1917.12 722.58,1920.65 728.24,1926.31 733.64,1920.91 739.3,1926.56 733.9,1931.97 739.55,1937.63 743.09,1934.09 744.5,1935.5 751.5,1942.5 751.5,1949.23 751.5,1950.73 746.5,1950.73 746.5,1958.73 752.5,1958.73 752.5,1990.73 752.5,1998.73 746.5,1998.73 746.5,2006.73 752.5,2006.73 752.5,2014.73 748.12,2014.73 748.12,2022.73 751.5,2022.73 751.5,2026.73 751.5,2072.5 744,2080 740.38,2080 739.13,2078.75 ccw(c749.1,2068.78) 736.76,2075.6 ccw(c749.1,2068.78) U3.G6@735,2068.78
  Top Layer w5: U1.A16@682.48,1737.95 v1(698.23,1753.7)
  MidLayer1 w3: v1(698.23,1753.7) 715,1770.47 715,1796.24
  MidLayer1 w4: 715,1796.24 v2(715,1815)
FLASH_D7: U1.B17 U3.H7 | length 666.6
  Top Layer w4: v2(764.33,1848.76) 740,1824.44 740,1807.34 742.34,1805 765,1805 775,1815 775,1830 780,1835 780,1860 764.5,1875.5 764.5,1929.66 774.37,1939.53 774.37,1950 774.37,1952 767,1952 767,1961 777,1961 777,1970 767,1970 767,1979 777,1979 777,1988 767,1988 767,1997 779.37,1997 779.37,2006 767,2006 767,2015 774.37,2015 774.37,2018.6 U3.H7@774.37,2029.41
  Top Layer w5: U1.B17@713.98,1706.46 v1(729.72,1722.2)
  MidLayer1 w3: v1(729.72,1722.2) 729.72,1725.14 751,1746.42 751,1759.5 761.34,1769.84 769.84,1769.84 770,1770 771.24,1770 773,1771.76 773,1778.24 771.24,1780 752.76,1780 751,1781.76 751,1790 752.81,1791.81 765,1791.81 765,1802.16 ; v2(764.33,1848.76) 765,1848.76 765,1838.9 765,1827.66 752.5,1827.66 752.5,1819.66 772,1819.66 772,1811.66 752.5,1811.66 752.5,1803.66 765,1803.66
FLASH_D8: U1.C14 U3.E1 | length 646.7
  Top Layer w4: U3.E1@538.15,2147.52 553.15,2132.52 553.15,2023.2 544,2014.05 540,2010.05 v2(540,1815)
  Top Layer w5: U1.C14@619.49,1674.96 v1(635.24,1690.71)
  MidLayer1 w3: v2(540,1815) 528,1803 528,1715.15 537.03,1706.12 545.14,1706.12 555.42,1695.83 555.42,1687.73 567.8,1675.36 575.9,1675.36 588.95,1662.31 588.95,1652.77 595.72,1646 608.74,1646 617.74,1655 617.74,1673.21 v1(635.24,1690.71)
FLASH_D9: U1.C15 U3.E3 | length 629.8
  Top Layer w4: U3.E3@616.89,2147.52 616.89,2141.35 ccw(c644.84,2141.35) 625.07,2121.59 628.03,2118.63 cw(c615.42,2106.01) 633.26,2106.01 633.26,2104.02 ccw(c646.29,2104.02) 637.06,2094.82 cw(c627.86,2085.6) 640.89,2085.6 640.89,2021.54 ; v2(640.18,1813.19) 640.18,1815.18 655,1830 655,1850 653.59,1851.41 652.9,1850.73 646.54,1857.09 650.76,1861.31 644.39,1867.68 640.86,1864.14 636.26,1868.74 632.5,1872.5 632.5,1906 638.5,1906 638.5,1915 632.5,1915 632.5,1924 638.5,1924 638.5,1933 628.5,1933 628.5,1942 638.5,1942 638.5,1951 631.65,1951 627.08,1955.57 623.96,1958.69 cw(c627.52,1962.21) 622.52,1962.2 622.5,1982.5 cw(c639,1982.5) 624.53,1990.42 640.26,2019.16 ccw(c635.89,2021.58) 640.89,2021.5
  Top Layer w5: U1.C15@650.98,1674.96 650.98,1675.37 666.32,1690.71 v1(666.32,1691.12)
  MidLayer1 w3: 640,1796.24 640,1795.75 640,1783.79 ccw(c644,1783.79) 644,1779.79 647.25,1779.79 cw(c647.25,1775.79) 647.25,1771.79 640,1771.79 ccw(c640,1767.79) 640,1763.79 646,1763.79 cw(c646,1759.79) 646,1755.79 644,1755.79 ccw(c644,1751.79) 640,1751.79 640,1743.47 641.18,1742.29 653.78,1729.69 653.78,1711.22 660,1705 674,1705 675.76,1703.24 675.76,1700.76 666.32,1691.32 v1(666.32,1691.12)
  MidLayer1 w4: 640,1796.24 640,1813.01 v2(640.18,1813.19)
FLASH_D10: U1.A17 U3.F3 | length 660
  Top Layer w4: U3.F3@616.89,2108.15 616.89,2104.96 ccw(c644.39,2104.96) 618,2097.22 ccw(c644.39,2104.96) 624.93,2085.53 626.95,2083.51 cw(c615.02,2071.58) 631.89,2071.58 631.89,2064.59 631.89,2054.27 617.34,2054.27 617.34,2045.27 632.89,2045.27 632.89,2036.27 ; 632.89,2040.77 632.89,2036.27 ; v2(636.81,1844.19) 635,1846 635,1848.75 624.5,1859.25 624.5,1868.84 624.5,1870.84 619.5,1870.84 619.5,1879.84 624.5,1879.84 624.5,1888.84 619.5,1888.84 619.5,1897.84 624.5,1897.84 624.5,1906.84 624.5,1910 624.5,1911.39 ccw(c603.72,1911.39) 618.41,1926.09 cw(c630.28,1937.95) 613.5,1937.95 613.5,1982.5 cw(c639,1982.5) 616.38,1994.27 631.32,2022.99 ccw(c627.52,2026.78) 632.89,2026.78 632.89,2036.27
  Top Layer w5: U1.A17@713.98,1737.95 729.72,1753.7 v1(730,1753.7)
  MidLayer1 w3: v1(730,1753.7) 731,1754.7 731,1796.24
  MidLayer1 w4: v2(636.81,1844.19) 637.63,1845 650,1845 652,1845 652,1863.39 661,1863.39 661,1840 670,1840 670,1863.39 679,1863.39 679,1841.14 688,1841.14 688,1863.39 697,1863.39 697,1845 707.3,1845 710,1845 731,1824 731,1796.24
FLASH_D11: U1.D14 U3.F4 | length 636.5
  Top Layer w4: v2(650,1890) 650,1915 671.5,1936.5 671.5,1960 671.5,1980 ccw(c667,1980) 667,1984.5 661.59,1984.5 cw(c661.59,1989) 661.59,1993.5 667,1993.5 ccw(c667,1998) 671.5,1998 671.5,2015 671.5,2092.91 U3.F4@656.26,2108.15
  Top Layer w5: U1.D14@619.49,1643.46 635.2,1659.18 v1(635.2,1660)
  MidLayer1 w3: 626.76,1796.24 630,1793 630,1736.89 621.24,1728.13 621.24,1713.76 630.29,1704.71 641.04,1704.71 649.24,1696.51 649.24,1684.91 637.54,1673.21 637.54,1663.66 635.2,1661.32 v1(635.2,1660)
  MidLayer1 w4: 626.76,1796.24 618,1805 618,1848 630.31,1860.31 ccw(c624.2,1866.42) 632.84,1866.42 632.84,1870 ccw(c615.57,1870) 627.78,1882.22 625.3,1884.7 cw(c638.11,1897.5) 620,1897.5 cw(c638.11,1897.5) 625.3,1910.3 629.39,1914.39 cw(c642.93,1900.86) 642.93,1920 cw(c642.93,1902.93) 655,1915 660,1910 660,1900 v2(650,1890)
FLASH_D12: U1.D15 U3.F5 | length 637
  Top Layer w3: U3.F5@695.63,2108.15 719.63,2084.15 719.63,2004.32 718.5,2003.19 718.5,1964.31 729.47,1953.34 v2(729.47,1950.53)
  Top Layer w5: U1.D15@650.98,1643.46 v1(666.73,1659.21)
  MidLayer1 w3: v1(666.73,1659.21) 684.23,1676.71 704.03,1676.71 715,1687.68 715,1700 723.2,1708.2 735.52,1708.2 745,1717.68 745,1725.78 757.03,1737.81 768.91,1737.81 779,1747.9 779,1837.3 780,1838.3 780,1855.01 765.01,1870 763.95,1871.06 ccw(c761.12,1868.24) 758.29,1871.06 756.11,1868.88 cw(c753.28,1871.71) 750.46,1868.88 cw(c753.28,1871.71) 750.46,1874.54 756.17,1880.26 ccw(c753.34,1883.08) 756.17,1885.91 ccw(c753.34,1883.08) 750.51,1885.91 738.91,1874.31 cw(c736.08,1877.14) 733.25,1874.31 cw(c736.08,1877.14) 733.25,1879.97 741.32,1888.03 ccw(c738.49,1890.86) 741.32,1893.69 731.06,1903.95 730,1905.01 730,1950 v2(729.47,1950.53)
FLASH_D13: U1.E15 U3.H5 | length 721.5
  Top Layer w3: v2@694.57,1921.07 U3.H5@694.57,2028.34
  Top Layer w5: U1.E15@650.98,1611.97 650.98,1613.88 664.82,1627.72 v1(664.82,1629.62) ; v2(693.5,1920) v2@694.57,1921.07 ; U3.H5@694.57,2028.34 U3.H5@695.63,2029.41
  MidLayer1 w3: 520.5,1796.24 520.5,1654.5 533.28,1641.72 578.04,1641.72 579.76,1640 609.54,1640 617.74,1631.8 617.74,1622.26 622.03,1617.97 656.68,1617.97 664.82,1626.11 v1(664.82,1629.62)
  MidLayer1 w4: 520.5,1796.24 520.5,1820 549.74,1849.24 549.74,1885 cw(c573.27,1885) 556.63,1901.63 582.93,1927.93 cw(c600,1910.86) 600,1935 667.89,1935 cw(c667.89,1909.39) 686,1927.5 v2(693.5,1920)
FLASH_D14: U1.E14 U3.G7 | length 698.9
  Top Layer w3: U3.G7@774.37,2068.78 774.37,2051.86 789.37,2036.86 789.37,1988.6 785,1984.23 785,1935.96 777.5,1928.46 777.5,1889.33 v2(781.83,1885)
  Top Layer w5: U1.E14@619.49,1611.97 635.24,1627.72 v1(635.24,1631.97)
  MidLayer1 w3: v1(635.24,1631.97) 639.48,1631.97 651.36,1643.84 671.16,1643.84 681.8,1654.48 681.8,1662.58 689.93,1670.71 706.53,1670.71 714.08,1663.16 714.08,1655.06 724.14,1645 735.31,1645 745.47,1655.16 745.47,1663.26 756.3,1674.09 764.4,1674.09 775.66,1685.35 775.66,1693.45 787.14,1704.93 795.24,1704.93 806.83,1716.52 806.83,1724.62 818.41,1736.2 831.2,1736.2 838.2,1743.2 838.2,1796.24
  MidLayer1 w4: v2(781.83,1885) 810,1885 838.2,1856.8 838.2,1796.24
FLASH_D15: U1.D17 U3.E7 | length 630.1
  Top Layer w3: U3.E7@774.37,2147.52 798.37,2123.52 798.37,2018.76 798.37,2017.26 ccw(c802.37,2017.26) 802.37,2013.26 824.65,2013.26 cw(c824.65,2009.26) 824.65,2005.26 802.37,2005.26 ccw(c802.37,2001.26) 798.37,2001.26 798.37,1984.87 792.19,1978.69 792.19,1933.25 790,1931.06 790,1920 798.33,1911.67 798.33,1873.57 794.5,1869.74 v2(794.5,1826.67)
  Top Layer w5: U1.D17@713.98,1643.46 v1(729.72,1659.21)
  MidLayer1 w3: v1(729.72,1659.21) 732.03,1661.52 732.03,1673.21 747.22,1688.41 747.22,1696.51 758.92,1708.2 767.02,1708.2 776.97,1718.15 776.97,1726.26 786.92,1736.2 796.2,1736.2 807,1747 807,1778.42 794.5,1790.92 794.5,1796.24
  MidLayer1 w4: 794.5,1796.24 v2(794.5,1826.67)